# Altium PCB Power_Inverter_350VDC.PcbDoc (part 1 of 3)
Units mm, origin at the board's own origin, x right, y up, seen from the top; angles counter-clockwise.
Board outline 340.25 x 180.25 mm, 2 copper layers (Top Layer, Bottom Layer); 181 components, 76 nets, 433 pads, 298 vias.
Unrouted connection lines stored in the file: 1.
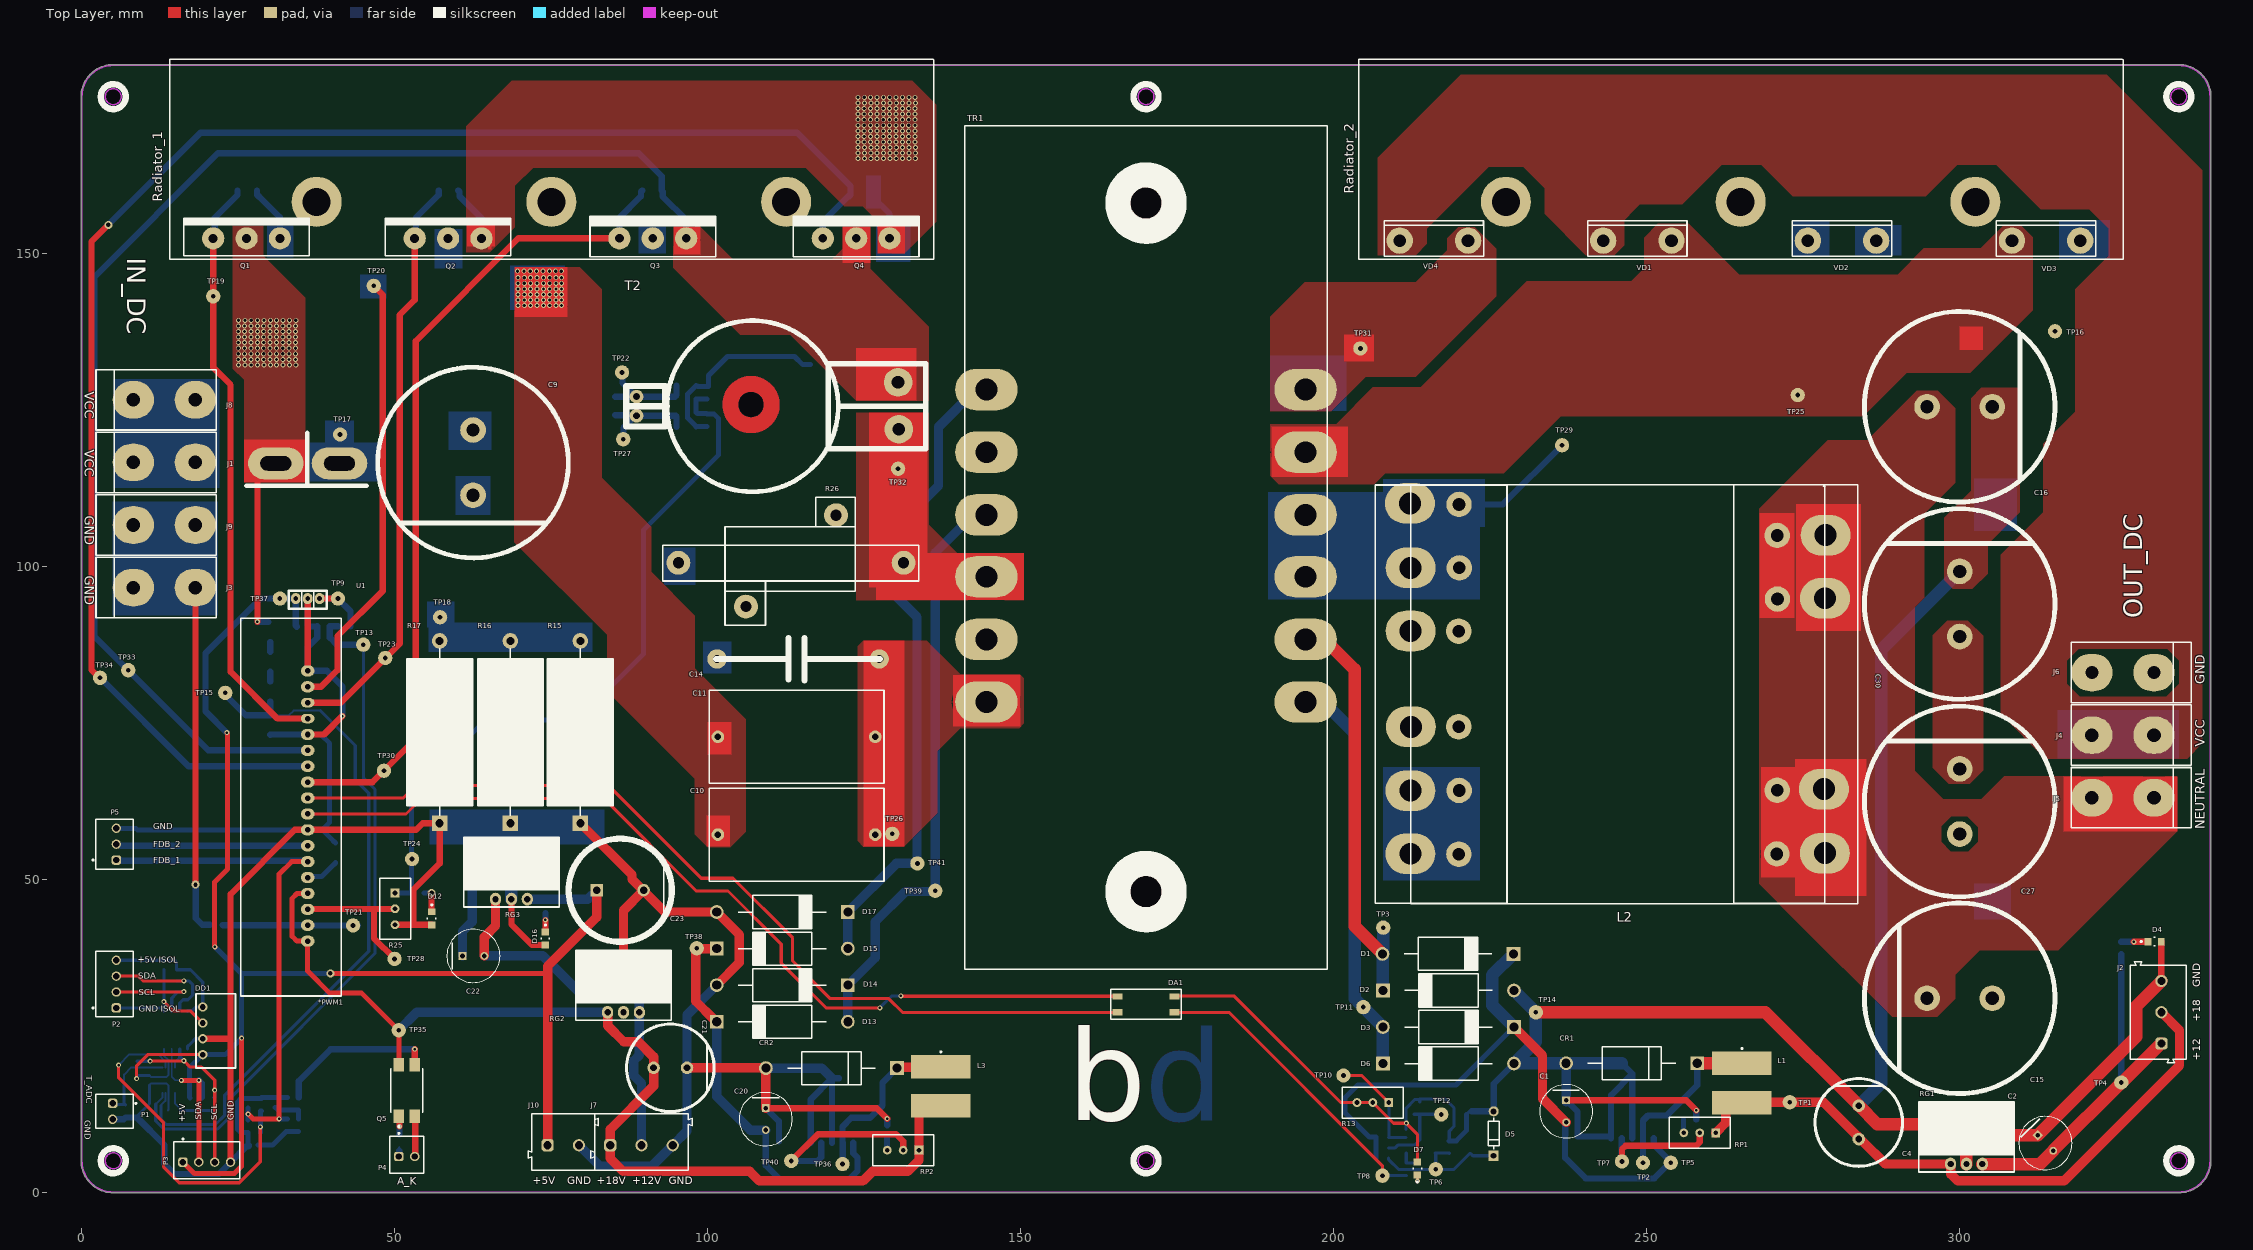
[diagram p0: Top Layer view]
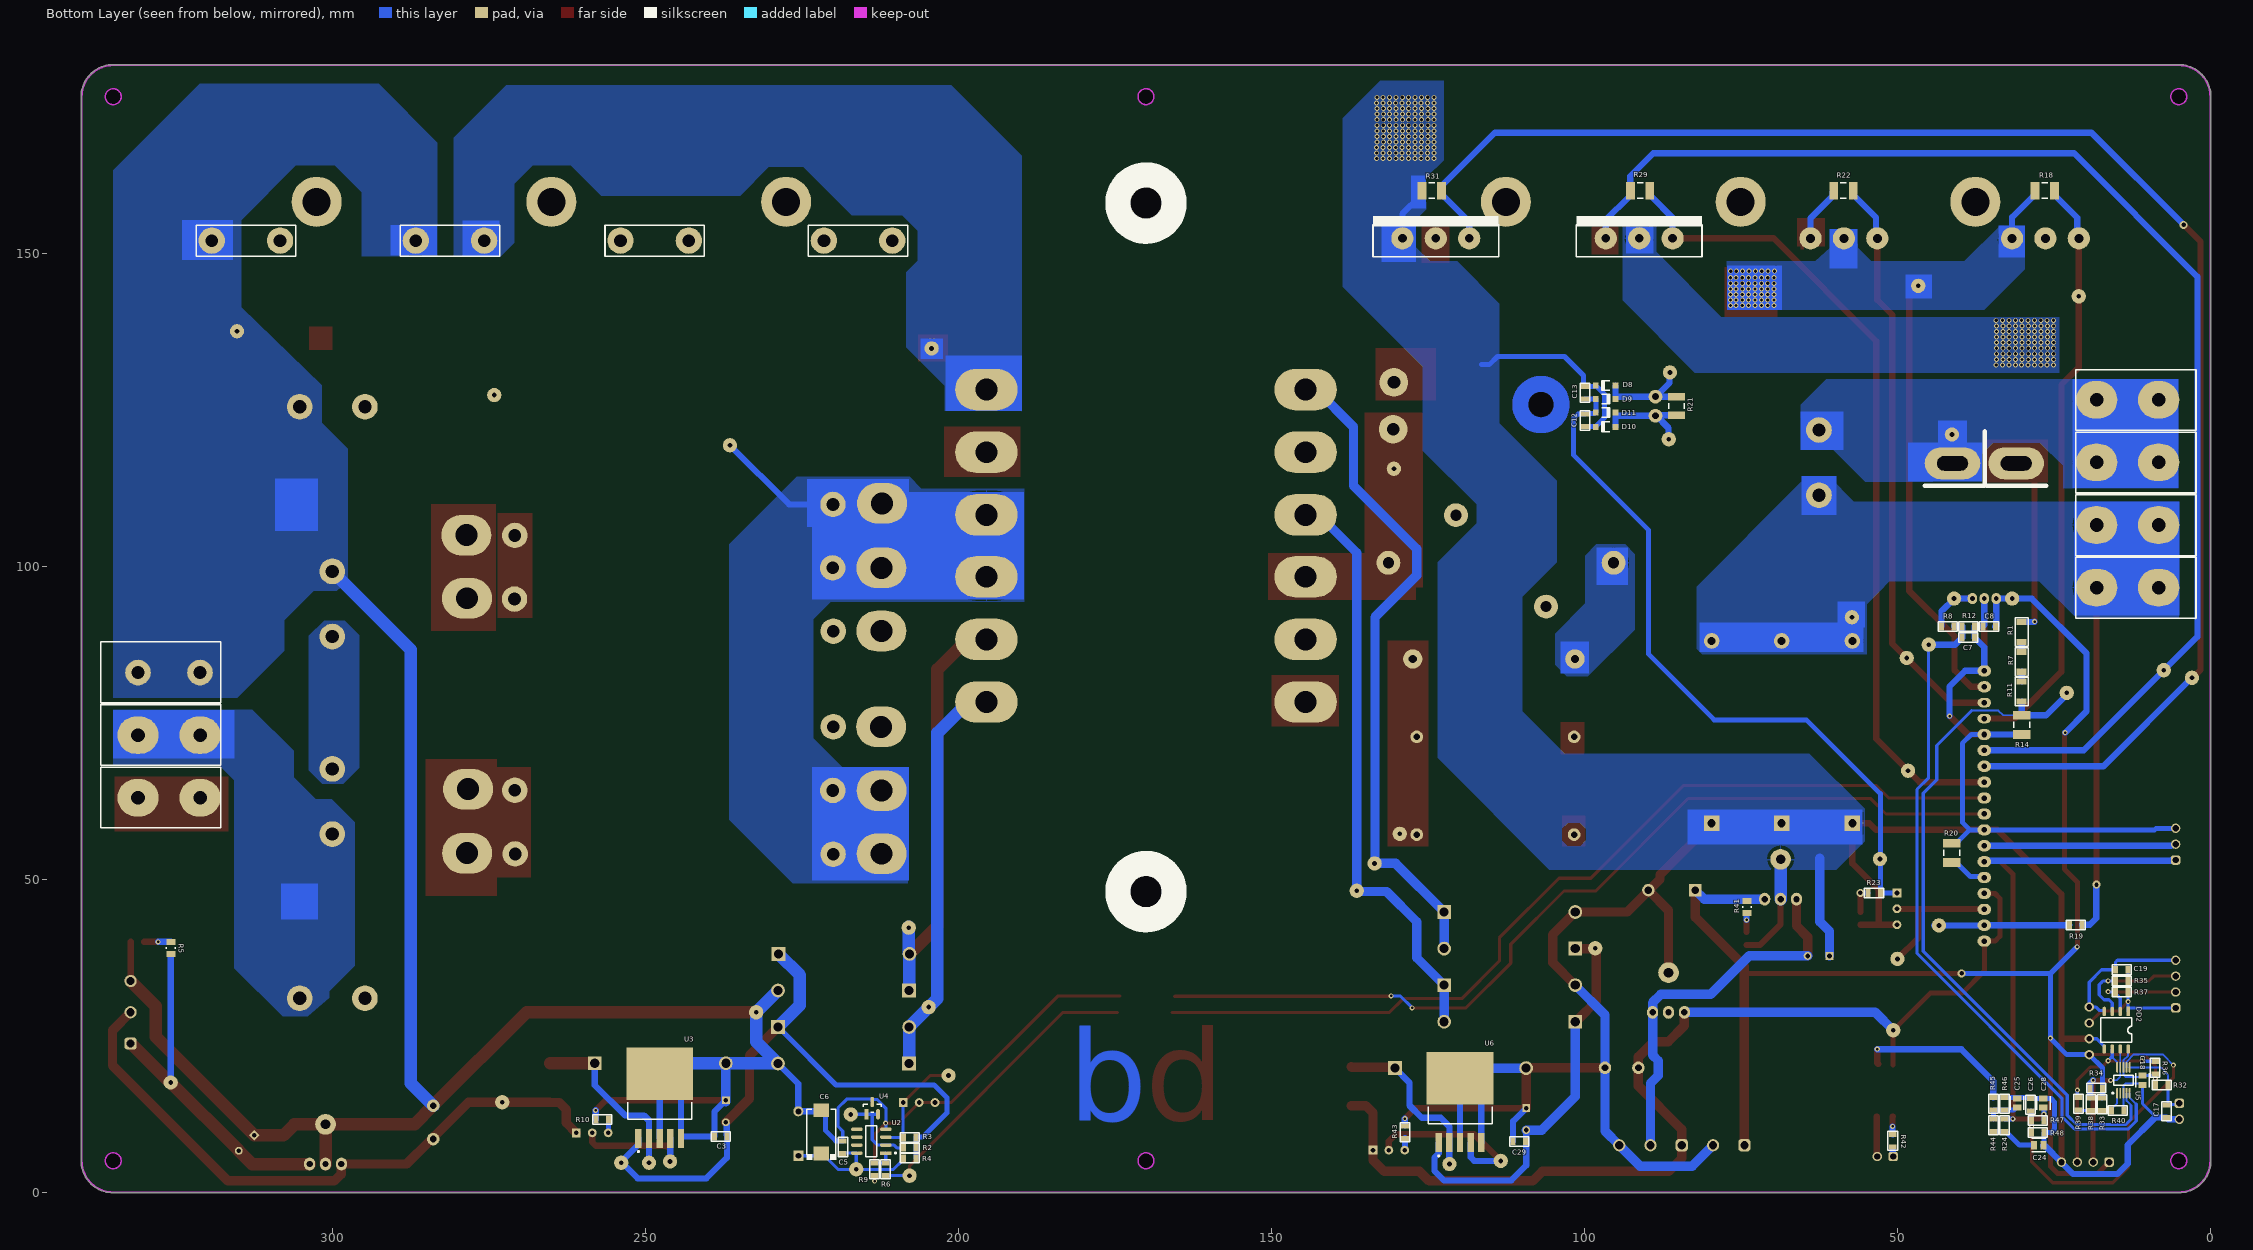
[diagram p1: Bottom Layer view, seen from below]
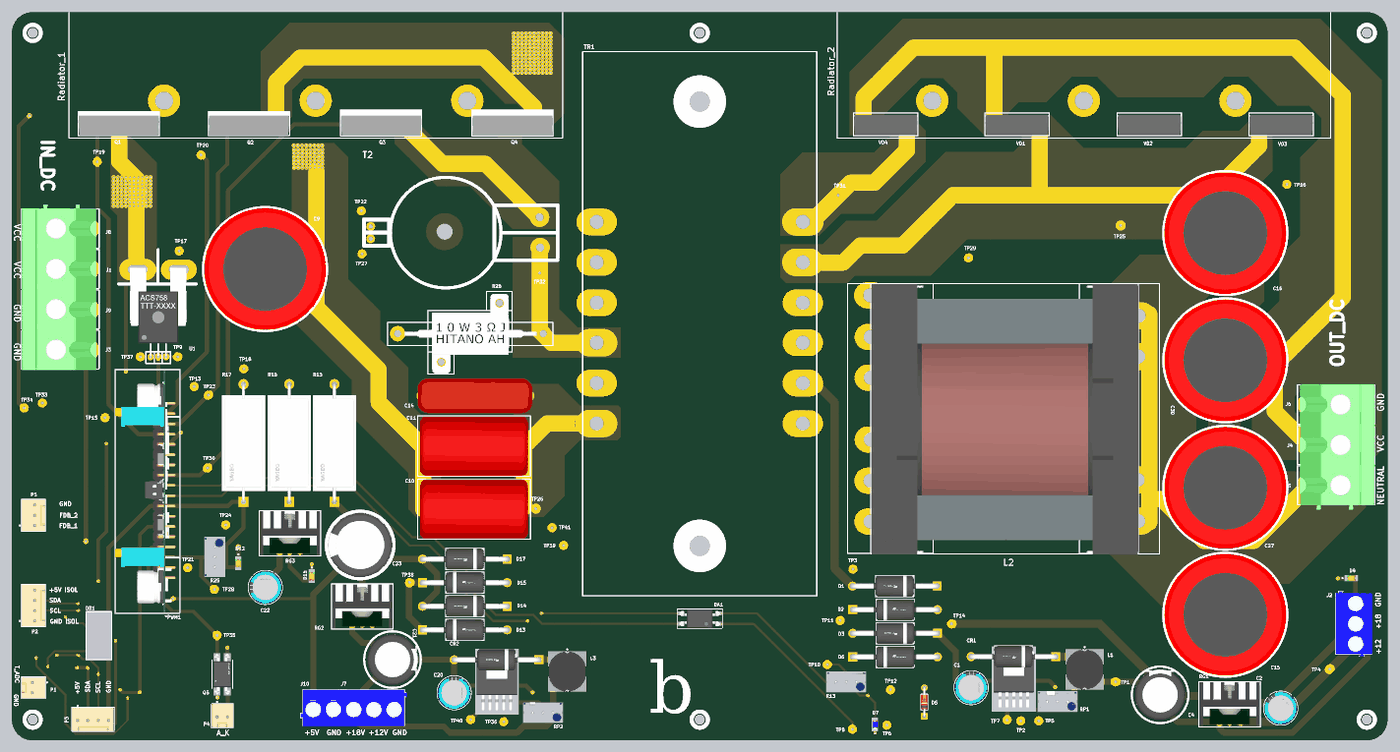
[diagram p3: 3D render of the assembled board from above, using the file's embedded part models]
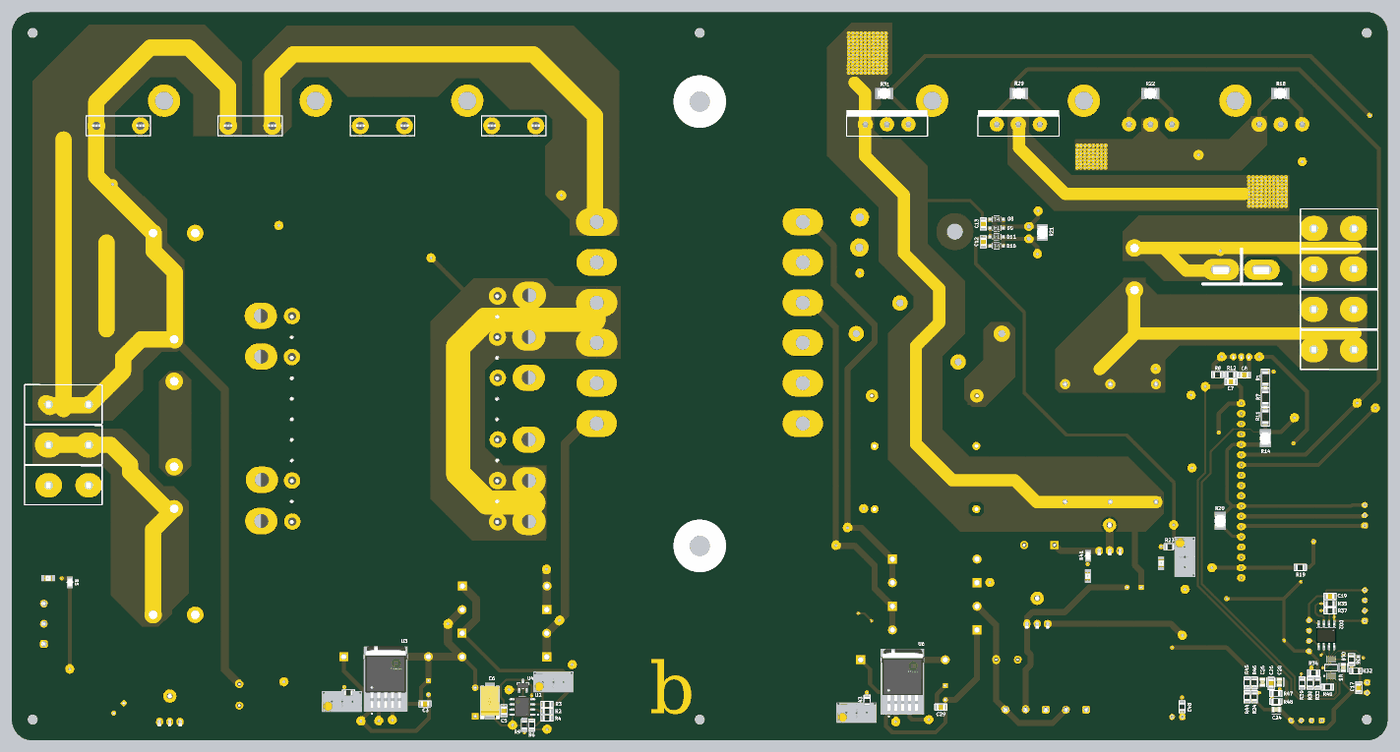
[diagram p4: 3D render of the assembled board from below, using the file's embedded part models]

## Layer stack, top to bottom
Top Solder: solder mask 0.0102, Solder Resist, Dk 3.5
Top Layer: signal copper 0.0356
Dielectric 1: dielectric 0.32, FR-4, Dk 4.8
Bottom Layer: signal copper 0.0356
Bottom Solder: solder mask 0.0102, Solder Resist, Dk 3.5

## Board outline
-0.125,5.022 cw(c0.002,5.022) -0.124,5.039 cw(c0.002,5.055) -0.125,5.055 -0.125,175.022 cw(c0.002,175.022) -0.125,175.026 cw(c5.002,175.022) 5.002,180.149 335.028,180.149 cw(c335.028,180.022) 335.033,180.149 cw(c335.002,175.022) 340.129,175.022 340.129,5.055 cw(c340.002,5.055) 340.128,5.038 cw(c340.002,5.022) 340.129,5.022 cw(c335.002,5.022) 335.033,-0.105 cw(c335.028,0.022) 335.028,-0.105 5.002,-0.105 cw(c5.002,5.022)
cut-out: 3.732,175.022 ccw(c5.002,175.022) 5.002,173.752 ccw(c5.002,175.022) 6.272,175.022 ccw(c5.002,175.022) 5.002,176.292 ccw(c5.002,175.022)
cut-out: 168.732,175.022 ccw(c170.002,175.022) 170.002,173.752 ccw(c170.002,175.022) 171.272,175.022 ccw(c170.002,175.022) 170.002,176.292 ccw(c170.002,175.022)
cut-out: 333.732,175.022 ccw(c335.002,175.022) 335.002,173.752 ccw(c335.002,175.022) 336.272,175.022 ccw(c335.002,175.022) 335.002,176.292 ccw(c335.002,175.022)
cut-out: 333.732,5.022 ccw(c335.002,5.022) 335.002,3.752 ccw(c335.002,5.022) 336.272,5.022 ccw(c335.002,5.022) 335.002,6.292 ccw(c335.002,5.022)
cut-out: 168.732,5.022 ccw(c170.002,5.022) 170.002,3.752 ccw(c170.002,5.022) 171.272,5.022 ccw(c170.002,5.022) 170.002,6.292 ccw(c170.002,5.022)
cut-out: 3.732,5.022 ccw(c5.002,5.022) 5.002,3.752 ccw(c5.002,5.022) 6.272,5.022 ccw(c5.002,5.022) 5.002,6.292 ccw(c5.002,5.022)

## Design rules (kind name [scope] priority, off if disabled: settings)
Clearance [All] p1: gap=0.254 ignorepadtopadclearanceinfootprint=TRUE except(0: THPad-Hole Via-Hole Fill-Hole Poly-Hole Region-Hole Text-Hole; 0.15: SMDPad-SMDPad SMDPad-THPad SMDPad-Via SMDPad-Fill SMDPad-Poly SMDPad-Region SMDPad-Text SMDPad-Hole; 0.2: Arc-Arc Arc-Track Arc-SMDPad Arc-THPad Arc-Via Arc-Fill Arc-Poly Arc-Region Arc-Text Arc-Hole Track-Track Track-SMDPad Track-THPad Track-Via Track-Fill Track-Poly Track-Region Track-Text Track-Hole Poly-Poly)
ComponentClearance [All] p1: gap=-5 collisioncheckmode=3 verticalgap=0.254 showdistances=FALSE
DiffPairsRouting [All] p1: maxlimit=5 minlimit=0.254 mostfreqgap=0.254 toplayer_minwidth=0.381 toplayer_maxwidth=0.381 toplayer_prefwidth=0.381 bottomlayer_minwidth=0.381 bottomlayer_maxwidth=0.381 bottomlayer_prefwidth=0.381 maxuncoupledlength=12.7
Height [All] p1: minheight=0 maxheight=150 prefheight=50
MinimumSolderMaskSliver [All] p1: minsoldermaskwidth=0.15
PlaneClearance [All] p1: clearance=0.7
PlaneConnect [All] p1: planeconnectstyle=Relief reliefexpansion=0.508 reliefentries=4 reliefconductorwidth=0.254 reliefairgap=0.5
PolygonConnect [All] p1: connectstyle=Relief reliefconductorwidth=0.254 reliefentries=4 polygonreliefangle="90 Angle" airgapwidth=0.5
RoutingVias [All] p1: holewidth=0.711 width=1.27 viastyle="Through Hole" minholewidth=0.711 minwidth=1.27 maxholewidth=0.711 maxwidth=1.27
SilkToSilkClearance [All] p1: silktosilkclearance=0.15
SilkToSolderMaskClearance [IsPad] p1: minsilkscreentomaskgap=0.15 clearancetoexposedcopper=TRUE
SolderMaskExpansion [All] p1: expansion=0.102 istentingtop=FALSE
Width [All] p1: maxlimit=5 minlimit=0.254 preferedwidth=2 minimp=50.000000 maximp=50.000000 favimp=50.000000
22 further rules are at their usual default settings.

## Components (designator, comment, footprint, x,y, rotation, side; value= is the part's Value field where it differs from the comment)
*PWM1 "PWM_controller" PWM_controller 85.092,68.682 r270 top locked
C1 "UKA1H101MPD1TD" FP-UKA1H101MPD1TD-MFG 237.125,12.925 r270 top locked
C2 "UKA1H101MPD1TD" FP-UKA1H101MPD1TD-MFG 313.7,7.85 r315 top
C3 "0.1uF" CAP-0805 237.95,8.9 r180 bottom locked
C4 "1000uF_50V" CAP_POL_13x26_1000uF_50V 283.875,11.15 r90 top
C5 "0.1uF" CAP-0805 218.442,7.214 r270 bottom
C6 "CAP-POLAR" CAP-TAN-D 221.871,9.627 r90 bottom
C7 "0.1uF" CAP-0805 38.61,88.621 r180 bottom
C8 "0.1uF" CAP-0805 35.316,90.352 r180 bottom
C9 "450V_330uF" CAP_450V_330uF 62.486,116.561 r180 top
C10 "3.3uF_630V" CAP_4.7uF_630V 114.175,57.125 r180 top
C11 "3.3uF_630V" CAP_4.7uF_630V 114.175,72.746 r180 top
C12 "1uF" CAP-0805 99.875,123.292 r270 bottom
C13 "1uF" CAP-0805 99.875,127.737 r90 bottom
C14 "1.5uF_630V" CAP_1.5uf_400V 114.429,85.192 r0 top
C15 "450V_330uF" CAP_450V_330uF 300,30.975 r90 top locked
C16 "450V_330uF" CAP_450V_330uF 300,125.475 r270 top locked
C17 "0.1uF" CAP-0805 6.987,12.929 r90 bottom
C18 "C0805C224K5RACTU" FP-C0805C-DN-MFG 10.797,17.882 r90 bottom value="0.22 μF"
C19 "CAP-NON-POLAR" CAP-0805 14.099,35.535 r0 bottom
C20 "UKA1H101MPD1TD" FP-UKA1H101MPD1TD-MFG 109.25,11.675 r270 top locked
C21 "1000uF_50V" CAP_POL_13x26_1000uF_50V 94.008,19.875 r0 top locked
C22 "UKA1H101MPD1TD" FP-UKA1H101MPD1TD-MFG 62.55,37.75 r0 top
C23 "CAP-POLAR" CAPPOL-16x25 86,48.25 r0 top
C24 "C0805C104K5RACTU" FP-C0805C-DN-MFG 27.386,7.52 r180 bottom value="0.10 μF"
C25 "C0805C104K5RACTU" FP-C0805C-DN-MFG 30.815,14.251 r90 bottom value="0.10 μF"
C26 "CAP-NON-POLAR" CAP-0805 28.656,13.997 r270 bottom
C27 "500V_470uF" CAP_450V_330uF 300,62.418 r0 top locked
C28 "C0805C104K5RACTU" FP-C0805C-DN-MFG 26.624,14.251 r90 bottom value="0.10 μF"
C29 "0.1uF" CAP-0805 110.35,8.125 r180 bottom
C30 "500V_470uF" CAP_450V_330uF 300,93.975 r0 top locked
CR1 "1N5822" FP-DO-201AD-MFG 247.605,20.6 r180 top locked
CR2 "1N5822" FP-DO-201AD-MFG 119.745,19.825 r180 top locked
D1 "" SR5100(DO-201AD 218.244,38.075 r180 top locked
D2 "" SR5100(DO-201AD 218.315,32.233 r0 top locked
D3 "" SR5100(DO-201AD 218.315,26.391 r180 top locked
D4 "LED" LED_GREEN 331.15,40.025 r0 top
D5 "BZX55B8V2" BZX55B8V2 225.554,9.373 r90 top
D6 "" SR5100(DO-201AD 218.315,20.549 r0 top locked
D7 "151031YS06000" LED_BLUE 213.362,3.785 r90 top
D8 "1N4148W-7-F" DIOD-SOD123-2_V 96.573,128.88 r0 bottom
D9 "1N4148W-7-F" DIOD-SOD123-2_V 96.573,126.721 r180 bottom
D10 "1N4148W-7-F" DIOD-SOD123-2_V 96.573,122.276 r0 bottom
D11 "1N4148W-7-F" DIOD-SOD123-2_V 96.573,124.562 r180 bottom
D12 "151031YS06000" LED_GREEN 55.867,43.751 r270 top
D13 "" SR5100(DO-201AD 111.89,27.234 r0 top locked
D14 "" SR5100(DO-201AD 111.89,33.076 r180 top locked
D15 "" SR5100(DO-201AD 111.89,38.918 r0 top locked
D16 "LED" LED_GREEN 74.025,40.525 r270 top
D17 "" SR5100(DO-201AD 111.89,44.76 r180 top locked
DA1 "PC817" 4-SMD 170.002,30 r180 top locked
DD1 "B0505S-1W" PLS-4-2.54mm 19.306,25.786 r270 top locked
DD2 "ADUM1250ARZ" SO8-150 14.988,25.883 r270 bottom
J1 "MG_136_HT" Conn_MEIGAN_MG136HT#1 10.764,116.593 r270 top
J2 "691101710003" 691101710003 331.725,28.75 r90 top
J3 "MG_136_HT" Conn_MEIGAN_MG136HT#1 10.764,96.593 r270 top
J4 "MG_136_HT" Conn_MEIGAN_MG136HT#1 328.502,73.022 r90 top locked
J5 "MG_136_HT" Conn_MEIGAN_MG136HT#1 328.502,63.022 r90 top locked
J6 "MG_136_HT" Conn_MEIGAN_MG136HT#2 328.502,83.022 r90 top locked
J7 "691101710003" 691101710003 89.4,8 r0 top locked
J8 "MG_136_HT" Conn_MEIGAN_MG136HT#1 10.764,126.593 r270 top
J9 "MG_136_HT" Conn_MEIGAN_MG136HT#1 10.764,106.593 r270 top
J10 "691101710002" 691101710002 76.9,8 r0 top locked
L1 "22µH, 2.04A" WE-PD2_1054 265.2,17.45 r270 top locked
L2 "750311457" Drossel 248.002,81.022 r270 top locked
L3 "22µH, 2.04A" WE-PD2_1054 137.225,16.925 r270 top
P1 "61900211121" 61900211121 5.209,12.929 r90 top
P2 "61900411121" 61900411121 5.2,33.249 r270 top
P3 "61900411121" 61900411121 19.941,5.101 r180 top
P4 "61900211121" 61900211121 51.9,6 r180 top locked
P5 "61900311121" 61900311121 5.2,55.601 r270 top locked
Q1 "IGBT 60N120TG" TO-264-3#1 26.302,153.022 r0 top locked
Q2 "IGBT 60N120TG" TO-264-3#1 58.502,153.022 r0 top locked
Q3 "IGBT 60N120TG" TO-264-3#2 91.202,153.022 r0 top
Q4 "IGBT 60N120TG" TO-264-3#2 123.702,153.022 r0 top
Q5 "PC817XNNIP0F" FP-PC817XNNIP0F-MFG 51.9,16.25 r90 top
R1 "300K" RES-1206 30.101,89.51 r90 bottom
R2 "10K" RES-0805 207.774,7.087 r180 bottom
R3 "1K" RES-0805 207.774,8.738 r180 bottom
R4 "1K" RES-0805 207.774,5.436 r180 bottom
R5 "10K" FP-CRCW0805-e3-MFG 325.8,39 r270 bottom
R6 "1K" RES-0805 211.584,3.658 r90 bottom
R7 "300K" RES-1206 30.101,84.735 r90 bottom
R8 "1K" RES-0805 41.912,90.399 r0 bottom
R9 "1K" RES-0805 213.362,3.658 r270 bottom
R10 "1K" RES-0805 256.9,11.625 r180 bottom
R11 "300K" RES-1206 30.101,79.985 r90 bottom
R12 "100K" RES-0805 38.61,90.399 r0 bottom
R13 "10K" RES_Adj_3296W_Bourns 206.25,14.326 r90 top
R14 "1K" FP-CRCW1210-e3-IPC_A 30.101,74.651 r90 bottom
R15 "0.5_Ohm" RES_5W_Ceramic_Yageo 79.631,73.508 r90 top
R16 "0.5_Ohm" RES_5W_Ceramic_Yageo 68.455,73.508 r90 top
R17 "0.5_Ohm" RES_5W_Ceramic_Yageo 57.152,73.508 r90 top
R18 "3.3K" RES_SMD_1210_IPC_A 26.418,160.022 r180 bottom locked
R19 "470 Ohm" RES-0805 21.475,42.7 r0 bottom
R20 "10K" FP-CRCW1210-e3-IPC_A 41.277,54.204 r270 bottom
R21 "CRCW12100000Z0EA" FP-CRCW1210-e3-IPC_B 85.225,125.6 r90 bottom
R22 "RES_1210" RES_SMD_1210_IPC_A 58.576,160.022 r180 bottom locked
R23 "10K" RES-0805 53.692,47.815 r180 bottom
R24 "10K" RES-0805 32.847,10.695 r90 bottom
R25 "3296W-1-202LF" RES_Adj_3296W_Bourns 50.025,45.275 r180 top
R26 "RES_10W" "10W 3 Ohm" 113.286,100.559 r180 top
R29 "RES_1210" RES_SMD_1210_IPC_A 91.061,160.022 r180 bottom locked
R31 "RES_1210" RES_SMD_1210_IPC_A 124.362,160.022 r180 bottom locked
R32 "10K" RES-0805 7.749,17.12 r0 bottom
R33 "10K" RES-0805 17.274,14.072 r90 bottom
R34 "10K" RES-0805 18.163,16.612 r180 bottom
R35 "10K" RES-0805 14.099,33.757 r180 bottom
R36 "10K" RES-0805 8.775,19.875 r270 bottom
R37 "10K" RES-0805 14.099,31.979 r180 bottom
R38 "10K" RES-0805 19.052,14.072 r270 bottom
R39 "10K" RES-0805 21.043,14.1 r270 bottom
R40 "10K" RES-0805 14.734,13.056 r0 bottom
R41 "10K" FP-CRCW0805-e3-MFG 73.975,45.575 r90 bottom
R42 "10K" RES-0805 50.7,8.2 r90 bottom
R43 "1K" RES-0805 128.625,9.6 r270 bottom
R44 "10K" RES-0805 34.625,10.695 r270 bottom
R45 "10K" RES-0805 34.625,14.124 r270 bottom
R46 "10K" RES-0805 32.847,14.124 r90 bottom
R47 "10K" RES-0805 27.513,11.457 r180 bottom
R48 "10K" RES-0805 27.513,9.552 r0 bottom
Radiator_1 "Radiator_122X80_M4" Radiator_122X80_M4 75.002,165.022 r0 top locked
Radiator_2 "Radiator_122X80_M4" Radiator_122X80_M4 265.002,165.022 r0 top locked
RG1 "LM7812CT" TO-220_Bended_Rad 301.593,7.548 r0 top locked
RG2 "LM7812CT" TO-220_Bended_Rad 87.033,31.773 r0 top
RG3 "LM7805CT" TO-220_Bended_Rad 69.125,49.875 r0 top locked
RP1 "10K" RES_Adj_3296W_Bourns 258.475,9.475 r90 top locked
RP2 "10K" RES_Adj_3296W_Bourns 131.2,6.725 r90 top
T2 "Current_SENS" Current_Sens_Case 106.9,125.825 r270 top
TP1 "Test_Point_PCB" Test_Point 272.85,14.375 r0 top
TP2 "Test_Point_PCB" Test_Point 249.403,4.703 r0 top
TP3 "Test_Point_PCB" Test_Point 207.901,42.266 r0 top
TP4 "Test_Point_PCB" Test_Point 325.825,17.525 r0 top
TP5 "Test_Point_PCB" Test_Point 253.85,4.7 r0 top
TP6 "Test_Point_PCB" Test_Point 216.283,3.658 r180 top
TP7 "Test_Point_PCB" Test_Point 246.038,4.912 r0 top
TP8 "Test_Point_PCB" Test_Point 207.774,2.642 r180 top
TP9 "Test_Point_PCB" Test_Point 40.896,94.844 r0 top
TP10 "Test_Point_PCB" Test_Point 201.551,18.644 r90 top
TP11 "Test_Point_PCB" Test_Point 204.726,29.566 r90 top
TP12 "Test_Point_PCB" Test_Point 217.172,12.421 r270 top
TP13 "Test_Point_PCB" Test_Point 44.96,87.478 r90 top
TP14 "Test_Point_PCB" Test_Point 232.285,28.733 r90 top
TP15 "Test_Point_PCB" Test_Point 22.9,79.775 r90 top
TP16 "Test_Point_PCB" Test_Point 315.225,137.55 r90 top
TP17 "" Test_Point 41.25,121.05 r90 top
TP18 "Test_Point_PCB" Test_Point 57.225,91.85 r90 top
TP19 "Test_Point_PCB" Test_Point 20.975,143.125 r90 top
TP20 "Test_Point_PCB" Test_Point 46.625,144.8 r90 top
TP21 "Test_Point_PCB" Test_Point 43.326,42.624 r90 top
TP22 "Test_Point_PCB" Test_Point 86.3,130.975 r90 top
TP23 "Test_Point_PCB" Test_Point 48.475,85.35 r90 top
TP24 "Test_Point_PCB" Test_Point 52.75,53.225 r90 top
TP25 "Test_Point_PCB" Test_Point 274.125,127.35 r90 top
TP26 "Test_Point_PCB" Test_Point 129.45,57.25 r90 top
TP27 "Test_Point_PCB" Test_Point 86.475,120.3 r90 top
TP28 "Test_Point_PCB" Test_Point 49.95,37.275 r0 top
TP29 "Test_Point_PCB" Test_Point 236.475,119.325 r90 top
TP30 "Test_Point_PCB" Test_Point 48.25,67.325 r90 top
TP31 "Test_Point_PCB" Test_Point 204.25,134.8 r90 top
TP32 "Test_Point_PCB" Test_Point 130.4,115.575 r90 top
TP33 "Test_Point_PCB" Test_Point 7.4,83.4 r90 top
TP34 "Test_Point_PCB" Test_Point 2.9,82.175 r90 top
TP35 "Test_Point_PCB" Test_Point 50.625,25.875 r90 top
TP36 "Test_Point_PCB" Test_Point 121.525,4.5 r90 top
TP37 "Test_Point_PCB" Test_Point 31.625,94.844 r90 top
TP38 "Test_Point_PCB" Test_Point 98.225,38.975 r90 top
TP39 "Test_Point_PCB" Test_Point 136.325,48.15 r90 top
TP40 "Test_Point_PCB" Test_Point 113.325,5 r90 top
TP41 "Test_Point_PCB" Test_Point 133.475,52.525 r90 top
TR1 "EE85" EE85_Ferrite_Core 170.002,103.022 r90 top locked
U1 "ACS758" ACS758-100 36.07,104.623 r0 top locked
U2 "LM358DR2G" FP-751-07-IPC_C 213.877,8.15 r0 bottom
U3 "" ON_Semiconductor_936A-02_MFG 247.704,15.094 r180 bottom locked
U4 "" TL431_SOT-23-3(A) 213.743,13.437 r90 bottom
U5 "ADS1115IDGST" TI-DGS10_N 13.845,17.882 r90 bottom
U6 "" ON_Semiconductor_936A-02_MFG 119.827,14.393 r180 bottom
VD1 "MUR4060" TO-247-2 248.502,152.022 r0 top locked
VD2 "MUR4060" TO-247-2 281.202,152.022 r0 top locked
VD3 "MUR4060" TO-247-2 313.802,152.022 r0 top locked
VD4 "MUR4060" TO-247-2 216.002,152.022 r0 top locked

## Footprints (in the part's own frame and the unit in brackets; to place one, negate y for a bottom-side part, rotate by r counter-clockwise, add the part's x,y. Pads: shape width x height; smd on the part's side, far side on the other; paste and mask are expansions set on the pad)
4-SMD [mm]
  rect 1.6x1 smd: 1(-4.575,1.27) 2(-4.575,-1.27) 3(4.575,-1.27) 4(4.575,1.27)
  silkscreen extent -5.6,-2.4 5.6,2.4, body extent -5,-2.29 5,2.29, height 3.85
"10W 3 Ohm" [mm]
  round 3.81 hole 1.778: 1(-18,0) 2(18,0) GND(-7.2,-7.6) GND(7.2,7)
  silkscreen extent -20.4,-10.45 20.5,10, body extent -16.39,-9.85 16.4,9.85, height 10.59
61900211121 [mm] "2.54mm Male Locking Header, 2p"
  rrect50% 1.5x1.5 hole 1: 1(1.27,0.3)
  round 1.5 hole 1: 2(-1.27,0.3)
  silkscreen extent -2.71,-3.52 2.71,2.98, body extent -2.54,-2.9 2.54,2.9, height 11.53
61900311121 [mm] "2.54mm Male Locking Header, 3p"
  rrect50% 1.5x1.5 hole 1: 1(2.54,0.3)
  round 1.5 hole 1: 2(0,0.3) 3(-2.54,0.3)
  silkscreen extent -3.98,-3.52 3.98,2.98, body extent -3.81,-2.9 3.81,2.9, height 11.53
61900411121 [mm] "2.54mm Male Locking Header, 4p"
  rrect50% 1.5x1.5 hole 1: 1(3.81,0.3)
  round 1.5 hole 1: 2(1.27,0.3) 3(-1.27,0.3) 4(-3.81,0.3)
  silkscreen extent -5.25,-3.52 5.25,2.98, body extent -5.08,-2.9 5.08,2.9, height 11.53
691101710002 [mm] "5,00mm - modular - blue - Horizontal entry with pressure clamp - 12,6mm height - 02p"
  rrect50% 1.95x1.95 hole 1.3: 1(-2.5,-0.5)
  round 1.95 hole 1.3: 2(2.5,-0.5)
  silkscreen extent -5.6,-4.5 5.6,4.5, body extent -5.6,-4.5 5.6,4.5, height 12.65
691101710003 [mm] "5,00mm - modular - blue - Horizontal entry with pressure clamp - 12,6mm height - 03p"
  rrect50% 1.95x1.95 hole 1.3: 1(-5,-0.5)
  round 1.95 hole 1.3: 2(0,-0.5) 3(5,-0.5)
  silkscreen extent -8.1,-4.5 8.1,4.5, body extent -8.1,-4.5 8.1,4.5, height 12.65
ACS758-100 [mil]
  oval 60x70 hole 30: 1(-75,-385) 2(0,-385) 3(75,-385)
  oval 350x200 hole 90 slot 195 at 0 deg: 4(200,465) 5(-200,465)
  silkscreen extent -385,-449 370,665, body extent -276,-404 276,492, height 280
BZX55B8V2 [mm]
  rect 1.6x1.6 hole 0.95 paste-1000 mask+0: 1(-3.55,0)
  round 1.6 hole 0.95 paste-1000 mask+0: 2(3.55,0)
  silkscreen extent -2.52,-0.85 2.52,0.85, body extent -3.8,-0.85 3.8,0.85, height 4.7
CAP-0805 [mm]
  rect 0.8x1.25 smd mask+0.015: 1(-1,0) 2(1,0)
  silkscreen extent -1.52,-0.76 1.52,0.76, body extent -1,-0.62 1,0.63, height 0.8
CAP-TAN-D [mm]
  rect 2.2x2.5 smd: 1(-3.45,0) 2(3.45,0)
  silkscreen extent -4.5,-2.4 3.65,2.4, body extent -3.8,-2.3 3.8,2.3, height 4
CAP_1.5uf_400V [mm]
  round 3.1 hole 1.3: 1(-12.954,0) 2(12.954,0)
  silkscreen extent -13.08,-3.43 13.08,3.3, body extent -14.25,-4.3 14.25,4.3, height 17.66
CAP_4.7uF_630V [mil]
  round 80 hole 40: 1(-495,0) 2(495,0)
  silkscreen extent -550,-293 550,293, body extent -527,-289 527,289, height 1242
CAP_450V_330uF [mm]
  round 4.1 hole 2.1: 1(0,-5.207) 2(0,5.207)
  silkscreen extent -15.23,-15.22 15.22,15.22, body extent -15.1,-15.2 15.15,15.1, height 52.45
CAP_POL_13x26_1000uF_50V [mm]
  round 2 hole 1.1: 1(-2.667,0) 2(2.667,0)
  silkscreen extent -7,-7 7,7, body extent -6.3,-6.3 6.31,6.31, height 25.72
CAPPOL-16x25 [mm]
  rect 2x2 hole 1.2 paste-1000 mask+0: 1(-3.75,0)
  round 2 hole 1.2 paste-1000 mask+0: 2(3.75,0)
  silkscreen extent -8.25,-8.25 8.25,8.25, body extent -8.35,-8.35 8.35,8.35, height 0.25
Conn_MEIGAN_MG136HT#1 [mm]
  oval 6x6.6 hole 2.159: 1(0,7.366) 1(0,-2.54)
  silkscreen extent -4.83,-8.51 4.83,10.67, body extent -6,-8.55 5,9.95, height 30.95
Conn_MEIGAN_MG136HT#2 [mm]
  oval 6x6.6 / inner round 4.1 / far side round 4.1 hole 2.1: 1(0,7.366) 1(0,-2.54)
  silkscreen extent -4.83,-8.51 4.83,10.67, body extent -6,-8.55 5,9.95, height 30.95
Current_Sens_Case [mil]
  round 180 hole 80: 1(-140,925) 2(155,930)
  round 86.61 hole 43.31: 3(-50,-720) 4(70,-720)
  round 60 hole 157.48: 106(0,0)
  Top Layer circle w100: c0,0 r129.92
  Bottom Layer circle w100: c0,0 r129.92
  silkscreen extent -528,-785 548,1100, body extent -689,-742 689,963, height 750
DIOD-SOD123-2_V [mm] "SOD123, 2-Leads, Body 2.7x1.55mm, Height 1.45mm"
  rect 0.9x0.95 smd: 1(1.575,0) 2(-1.575,0)
  silkscreen extent -0.64,-0.83 0.64,0.77, body extent -1.88,-0.8 1.88,0.8, height 1.3
Drossel [mil]
  oval 255.91x314.96 hole 137.8: 1(-943,1204) 2(-546,1200) 3(655,1193) 4(1057,1199) 5(-1143,-1411) 6(-737,-1406) 7(664,-1408) 8(1061,-1408) 9(-340,-1406) 10(263,-1405)
  round 160 hole 80: 1(-941,899) 2(-541,901) 3(662,899) 4(1062,897) 5(-1136,-1102) 6(-737,-1100) 7(663,-1101) 8(1064,-1103) 9(-339,-1104) 10(262,-1104)
  silkscreen extent -1259,-1630 1376,1405, body extent -1251,-1399 1383,1203, height 2024
EE85_Ferrite_Core [mm]
  round 5.08 hole 5: 0(-55,0) 0(55,0)
  oval 6.6x10 hole 3.5: 1(-24.7,25.5) 2(-14.7,25.5) 3(-4.7,25.5) 4(5.2,25.5) 5(15.2,25.5) 6(25.2,25.5) 7(-24.7,-25.5) 8(-14.7,-25.5) 9(-4.7,-25.5) 10(5.2,-25.5) 11(15.2,-25.5) 12(25.2,-25.5)
  silkscreen extent -67.37,-28.96 67.37,28.96, body extent -67.5,-29 67.5,29, height 93.65
FP-751-07-IPC_C [mm]
  rect 1.874x0.543 smd paste+0 mask+0: 1(-2.316,1.905)
  rrect100% 1.874x0.543 smd paste+0 mask+0: 2(-2.316,0.635) 3(-2.316,-0.635) 4(-2.316,-1.905) 5(2.316,-1.905) 6(2.316,-0.635) 7(2.316,0.635) 8(2.316,1.905)
  silkscreen extent -3.98,-2.45 0.88,2.45, body extent -3,-2.45 3,2.45, height 1.75
FP-C0805C-DN-MFG [mm]
  rect 0.95x1.35 smd paste+0 mask+0: 1(-0.75,0) 2(0.75,0)
  silkscreen extent -1.1,-1.07 1.1,1.07, body extent -1,-0.63 1,0.63, height 0.88
FP-CRCW0805-e3-MFG [mm]
  rect 0.95x1.45 smd paste+0 mask+0: 1(-0.975,0) 2(0.975,0)
  silkscreen extent -0.13,-0.7 0.13,0.7, body extent -1,-0.63 1,0.63, height 0.5
FP-CRCW1210-e3-IPC_A [mm]
  rect 1.405x2.806 smd paste+0 mask+0: 1(-1.551,0) 2(1.551,0)
  silkscreen extent -0.47,-1.25 0.47,1.25, body extent -1.6,-1.25 1.6,1.25, height 0.6
FP-CRCW1210-e3-IPC_B [mm]
  rect 1.205x2.706 smd paste+0 mask+0: 1(-1.451,0) 2(1.451,0)
  silkscreen extent -0.47,-1.25 0.47,1.25, body extent -1.6,-1.25 1.6,1.25, height 0.6
FP-DO-201AD-MFG [mm]
  rect 2.2x2.2 hole 1.45 paste-1000 mask+0: 1(-10.47,0)
  round 2.2 hole 1.45 paste-1000 mask+0: 2(10.47,0)
  silkscreen extent -7,-2.65 7,2.65, body extent -11.67,-2.75 11.67,2.75, height 0.25
FP-PC817XNNIP0F-MFG [mm]
  rect 2.2x1.7 smd paste+0 mask+0: 1(-4.1,1.27) 2(-4.1,-1.27) 3(4.1,-1.27) 4(4.1,1.27)
  silkscreen extent -5.87,-2.54 3.5,2.54, body extent -5.3,-2.64 5.3,2.64, height 0.25
FP-UKA1H101MPD1TD-MFG [mm]
  rect 1.25x1.25 hole 0.75 paste-1000 mask+0: 1(-1.75,0)
  round 1.25 hole 0.75 paste-1000 mask+0: 2(1.75,0)
  silkscreen extent -4.25,-4.25 4.25,4.25, body extent -4.35,-4.35 4.35,4.35, height 0.25
LED_BLUE [mm]
  rect 1.1x1.2 smd paste+0 mask+0: 1(-1.05,0) 2(1.05,0)
  silkscreen extent -2.27,-0.67 0.13,0.67, body extent -1,-0.63 1,0.63, height 0.8
LED_GREEN [mm]
  rect 1.1x1.2 smd paste+0 mask+0: 1(-1.05,0) 2(1.05,0)
  silkscreen extent -2.27,-0.67 0.13,0.67, body extent -1,-0.63 1,0.63, height 0.8
ON_Semiconductor_936A-02_MFG [mm]
  rect 1.016x3.05 smd paste+0 mask+0: 1(-3.404,-6.485) 2(-1.702,-6.485) 3(0,-6.485) 4(1.702,-6.485) 5(3.404,-6.485)
  rect 10.66x8.38 smd paste+0 mask+0: 6(0,3.82)
  silkscreen extent -5.12,-8.72 5.12,-0.75, body extent -5.01,-7.11 5.01,7.14, height 4.83
PLS-4-2.54mm [mm]
  round 1.5 hole 0.9: 1(-3.81,0) 2(-1.24,0) 3(1.27,0) 4(3.81,0)
  silkscreen extent -5.95,-1.07 5.95,5.23, body extent -5.8,-0.92 5.8,5.08, height 10.16
PWM_controller [mil]
  oval 70x85 hole 35: 1(1125,-1930) 2(1025,-1930) 3(925,-1930) 4(825,-1930) 5(725,-1930) 6(625,-1930) 7(525,-1930) 8(425,-1930) 9(325,-1930) 10(225,-1930) 11(125,-1930) 12(25,-1930) 13(-75,-1930) 14(-175,-1930) 17(-475,-1930) 18(-575,-1930)
  oval 59.06x85 hole 35: 15(-275,-1930) 16(-375,-1930)
  silkscreen extent -905,-2350 1470,-1720, body extent -896,-2352 1466,-1720, height 2330
Radiator_122X80_M4 [mm]
  round 8 hole 4.5: 1(-37.5,-6.8) 1(0,-6.8) 1(37.5,-6.8)
  silkscreen extent -61,-16 61.1,16, body extent -61,-16 61,16, height 80.27
RES-0805 [mm]
  rect 0.8x1.25 smd mask+0.015: 1(-1,0) 2(1,0)
  silkscreen extent -1.52,-0.76 1.52,0.76, body extent -1,-0.62 1,0.63, height 0.6
RES-1206 [mm]
  rect 1x1.6 smd: 1(-1.6,0) 2(1.6,0)
  silkscreen extent -2.29,-1.02 2.29,1.02, body extent -1.6,-0.8 1.6,0.8, height 0.6
RES_5W_Ceramic_Yageo [mm]
  rect 2.5x2.5 hole 1.3 paste-1000 mask+0: 1(-14.555,0)
  round 2.5 hole 1.3 paste-1000 mask+0: 2(14.555,0)
  silkscreen extent -13.38,-5.25 13.38,5.25, body extent -15.43,-5.35 15.43,5.35, height 0.25
RES_Adj_3296W_Bourns [mm]
  rect 1.4x1.4 hole 0.75 paste-1000 mask+0: 1(0,-2.54)
  round 1.4 hole 0.75 paste-1000 mask+0: 2(0,0) 3(0,2.54)
  silkscreen extent -2.49,-4.89 2.47,4.89, body extent -2.59,-4.99 2.57,4.99, height 0.25
RES_SMD_1210_IPC_A [mm]
  rect 1.405x2.806 smd paste+0 mask+0: 1(-1.551,0) 2(1.551,0)
  silkscreen extent -0.47,-1.25 0.47,1.25, body extent -1.6,-1.25 1.6,1.25, height 0.6
SO8-150 [mm]
  rect 1.5x0.6 smd: 1(-3,1.9)
  oval 1.5x0.6 smd: 2(-3,0.63) 3(-3,-0.64) 4(-3,-1.91) 5(3,-1.91) 6(3,-0.64) 7(3,0.63) 8(3,1.9)
  silkscreen extent -1.95,-2.45 1.95,2.45, body extent -3,-2.45 3,2.45, height 1.7
SR5100(DO-201AD [mm]
  rect 2.2x2.2 hole 1.45 paste-1000 mask+0: 1(-10.47,0)
  round 2.2 hole 1.45 paste-1000 mask+0: 2(10.47,0)
  silkscreen extent -7,-2.67 7,2.67, body extent -11.67,-2.75 11.67,2.75, height 0.25
Test_Point [mil]
  round 90 hole 30 unplated paste+4 mask+4: 1(0,0)
TI-DGS10_N [mm] "SOP, 10-Leads, Body 3x3mm, Pitch 0.5mm, IPC Medium Density"
  oval 1.7x0.3 smd: 1(-2.05,1) 2(-2.05,0.5) 3(-2.05,0) 4(-2.05,-0.5) 5(-2.05,-1) 6(2.05,-1) 7(2.05,-0.5) 8(2.05,0) 9(2.05,0.5) 10(2.05,1)
  silkscreen extent -2.17,-1.55 0.8,1.83, body extent -1.55,-1.55 1.55,1.55, height 1.1
TL431_SOT-23-3(A) [mm]
  rect 1.659x0.627 smd paste+0 mask+0: 1(-0.977,0.915)
  rrect100% 1.659x0.627 smd paste+0 mask+0: 2(-0.977,-0.915) 3(0.977,0)
  silkscreen extent -0.65,-1.45 0.65,1.45, body extent -1.2,-1.45 1.2,1.45, height 1.1
TO-220_Bended_Rad [mil]
  oval 70x80 hole 40: 1(-120,-120) 2(-20,-120) 3(80,-120)
  round 130 hole 60: 2(-20,130)
  silkscreen extent -320,-170 280,270, body extent -315,-165 275,265, height 997
TO-247-2 [mm]
  round 4.2 hole 2.032: 1(-5.461,0) 3(5.461,0)
  silkscreen extent -7.94,-2.48 7.94,3.17, body extent -7.9,-2.3 7.9,2.71, height 37.4
TO-264-3#1 [mm]
  round 3.55 hole 1.45: 1(-5.334,-0.635) 2(0,-0.635) 3(5.334,-0.635)
  silkscreen extent -10.03,-3.43 10.03,2.54, body extent -10,-3.5 10,1.5, height 38.4
TO-264-3#2 [mm]
  round 3.556 hole 1.397: 1(-5.334,-0.635) 2(0,-0.635) 3(5.334,-0.635)
  silkscreen extent -10.03,-3.56 10.16,2.92, body extent -10,-3.5 10,1.5, height 32.05
WE-PD2_1054 [mm] "SMD Power Inductor, 2-Leads, body 10x9mm"
  rect 3.75x9.5 smd: 1(-3.125,0) 2(3.125,0)
  silkscreen extent -5.62,-0.12 -5.38,0.13, body extent -5.04,-4.5 5.04,4.5, height 5.43

## Part data
C1 C2 C20 C22: library part CMP-12462-000027-1, "CAP ALUM 100UF 20% 50V RADIAL", Capacitance=100uF, Case/Package=Radial, Leakage Current=4uA, Max Operating Temperature=105°C, Min Operating Temperature=-55°C, Package Quantity=1, Ripple Current=190mA, Tolerance=20%, Voltage Rating=50V, Diameter=8mm, Height=11.5mm, Height - Seated (Max)=0.512inch, Lead Pitch=3.5mm, Length=11.5mm, Life (Hours)=2000Hour, Mount="Through Hole", Packaging="Tape and Reel", REACH SVHC="No SVHC", Series=KA, Termination=Radial, Voltage Rating (DC)=50V
C3 C5 C7 C8 C10 C11 C12 C13 C17 C29: library part CAP-NON-POLAR
C4 C21: library part CAP_polar_Hitano
C9: library part CAP_POL_LOW_IMP
C14: library part 3.3uF_630V
C15 C16 C27 C30: library part CAP_450V_330uF
C18: library part CMP-1036-04552-2, "CAP CER 0.22UF 50V X7R 0805", Capacitance="0.22 μF", Manufacturer=KEMET, Package=C0805C-DN, Temperature="-55°C to +125°C", Temperature Characteristic=X7R, Temperature Coefficient=30ppm/°C, Temperature Range High=+125°C, Temperature Range Low=-55°C, Tolerance=0.1, Voltage Rating="50 V", Automotive=No, Category=Cap, ComponentLink2Description=Datasheet, ComponentLink2URL=https://content.kemet.com/datasheets/KEM_C1003_C0G_SMD.pdf, Device Class L1="Passive Components", Device Class L2=Capacitors, Device Class L3="Ceramic Capacitors", Digikey Description="CAP CER 0.22UF 50V X7R 0805", Height=0.88mm, Ipc Land Pattern Name=CAPC200125X78, Lead Free=Yes, Manufacturer Part Number=C0805C224K5RACTU, Material=Ceramic, Mouser Description="CAP CER 0.22UF 50V X7R 0805", Octopart=https://octopart.com/c0805c224k5ractu-kemet-144670, RoHS=TRUE
C24 C25 C28: library part CMP-2007-00279-2, "CAP CER 0.1UF 50V X7R 0805", Capacitance="0.10 μF", Manufacturer=KEMET, Package=C0805C-DN, Temperature="-55°C to +125°C", Temperature Characteristic=X7R, Temperature Coefficient=30ppm/°C, Temperature Range High=+125°C, Temperature Range Low=-55°C, Tolerance=0.1, Voltage Rating="50 V", Automotive=No, Category=Cap, ComponentLink2Description=Datasheet, ComponentLink2URL=https://content.kemet.com/datasheets/KEM_C1003_C0G_SMD.pdf, Device Class L1="Passive Components", Device Class L2=Capacitors, Device Class L3="Ceramic Capacitors", Digikey Description="CAP CER 0.1UF 50V X7R 0805", Height=0.88mm, Ipc Land Pattern Name=CAPC200125X78, Lead Free=Yes, Manufacturer Part Number=C0805C104K5RACTU, Material=Ceramic, Mouser Description="Cap Ceramic 0.1uF 50V X7R 10% SMD 2.0 x 1.2 mm 125 C Paper T/R", Octopart=https://octopart.com/c0805c104k5ractu-kemet-143926, RoHS=TRUE
CR1 CR2: "DIODE SCHOTTKY 40V 3A DO201AD", Forward Current=3A, Manufacturer=STMicroelectronics, Max Junction Temp=+150°C, Max Repetitive Reverse Voltage=40V, Max Surge Forward Current=80A, Package=DO-201AD, Peak Reverse Current=2mA, Temperature="to +150°C", Automotive=No, Category=Diode, ComponentLink2Description=Datasheet, ComponentLink2URL=https://www.st.com/resource/en/datasheet/1n5822.pdf, Device Class L1="Discrete Semiconductors", Device Class L2=Diodes, Device Class L3="Schottky Diodes", Digikey Description="DIODE SCHOTTKY 40V 3A DO201AD", Height=5.3mm, Lead Free=Yes, Manufacturer Part Number=1N5822, Mouser Description="Schottky Diodes & Rectifiers Vr/40V Io/3A BULK", Octopart=https://octopart.com/1n5822-stmicroelectronics-323225, RoHS=TRUE, Temperature Range High=+150°C
D1 D2 D3 D6 D13 D14 D15 D17: library part SR5100
D4 D16: "WURTH ELEKTRONIK - 151031YS06000 - LED, Yellow, Through Hole, T-1 (3mm), 30 mA, 2 V, 590 nm", Manufacturer_Name="Wurth Elektronik", Manufacturer_Part_Number=151031YS06000, Mouser Part Number=710-151031YS06000, Datasheet Link=https://katalog.we-online.de/led/datasheet/151031YS06000.pdf, Geometry.Height=5.5mm, Mouser Price/Stock=https://www.mouser.co.uk/ProductDetail/Wurth-Elektronik/151031YS06000?qs=LlUlMxKIyB3xSYYW%252BcuBiQ%3D%3D
D7 D12: library part LED, "WURTH ELEKTRONIK - 151031YS06000 - LED, Yellow, Through Hole, T-1 (3mm), 30 mA, 2 V, 590 nm", Manufacturer_Name="Wurth Elektronik", Mouser Part Number=710-151031YS06000, Datasheet Link=https://katalog.we-online.de/led/datasheet/151031YS06000.pdf, Geometry.Height=5.5mm, Manufacturer_Part_Number=151031YS06000, Mouser Price/Stock=https://www.mouser.co.uk/ProductDetail/Wurth-Elektronik/151031YS06000?qs=LlUlMxKIyB3xSYYW%252BcuBiQ%3D%3D
D8 D9 D10 D11: library part 1N4148, "Fast Switching Diode, 100 V, 0.15 A, -65 to 150 degC, 2-Pin?SOD123, RoHS, Tape and Reel", If - Forward Current=0.15A, Ir - Reverse Current=1uA, Manufacturer=DiodesIncorporated, Max Surge Current=2A, Maximum Operating Temperature=+150C, Minimum Operating Temperature=-65C, Operating Temperature Range=-65Cto+150C, Package / Case=SOD-123, Package Reference=SOD123-2, Peak Reverse Voltage=100V, Vf - Forward Voltage=1.25V, Brand=DiodesIncorporated, Configuration=Single, Datasheet URL=http://www.farnell.com/datasheets/1915529.pdf, Datasheet Version="Rev. 24-2, 10/2013", Factory Pack Quantity=3000, Height=1.25mm, Length=2.85mm, Manufacturer URL=http://www.diodes.com/, Mounting Style=SMD/SMT, Package URL=http://www.diodes.com/datasheets/ds18004.pdf, Packaging=Reel, Product=SwitchingDiodes, Product Category=Diodes-GeneralPurpose,Power,Switching, Recovery Time=4ns, RoHS=True, Series=1N4148, Type=SwitchingDiode, Unit Weight=0.000353oz, Width=1.7mm
J1 J3 J4 J5 J6 J8 J9: library part Connector_MEIGAN_MG136HT
J2 J7: "WR-TBL Series 101 Horizontal Entry Modular, THT, pitch 5mm, 3p", Manufacturer="Wurth Elektronik", Operating Temperature Max=105°C, Operating Temperature Min=-40°C, Rated Current=16A, Working Voltage=250V, Application="Pressure Clamp", Category="Terminal Blocks", ComponentLink1Description="Website Link", ComponentLink1URL=https://www.we-online.com/redexpert/article/691101710003?ad, ComponentLink2Description="Datasheet Link", ComponentLink2URL=https://www.we-online.com/redexpert/spec/691101710003?ad, Manufacturer Part Number=691101710003, Match Code=WR-TBL, Modularity=Yes, Mount="Through Hole", Number of Pins=3, Number of Rows=1, Orientation=Horizontal, Packaging=Box, Pitch=5mm
J10: "WR-TBL Series 101 Horizontal Entry Modular, THT, pitch 5mm, 2p", Manufacturer="Wurth Elektronik", Operating Temperature Max=105°C, Operating Temperature Min=-40°C, Rated Current=16A, Working Voltage=250V, Application="Pressure Clamp", Category="Terminal Blocks", ComponentLink1Description="Website Link", ComponentLink1URL=https://www.we-online.com/redexpert/article/691101710002?ad, ComponentLink2Description="Datasheet Link", ComponentLink2URL=https://www.we-online.com/redexpert/spec/691101710002?ad, Manufacturer Part Number=691101710002, Match Code=WR-TBL, Modularity=Yes, Mount="Through Hole", Number of Pins=2, Number of Rows=1, Orientation=Horizontal, Packaging=Box, Pitch=5mm
L1 L3: library part 744776122, "WE-PD2 SMT Power Inductor, size 1054, 22µH, 2.04A, 0.1Ω", Case/Size Code=1054, DC Resistance=0.051Ω, DC Resistance Max=0.1Ω, Inductance=22µH, Manufacturer="Wurth Elektronik", Operating Temperature Max=125°C, Operating Temperature Min=-40°C, Rated Current=2.04A, Saturation Current=2.07A, Self Resonant Frequency=16MHz, Category="Unshielded Power Inductors", ComponentLink1Description="Website Link", ComponentLink1URL=https://www.we-online.com/redexpert/article/744776122?ad, ComponentLink2Description="Datasheet Link", ComponentLink2URL=https://www.we-online.com/redexpert/spec/744776122?ad, Height=5.4mm, Length=10mm, Manufacturer Part Number=744776122, Match Code=WE-PD2, Mount="Surface Mount", Packaging="Tape and Reel", Width=9mm
L2: library part DROSEL, "Drosel", Manufacturer="Wuerth Elektronik", ComponentLink1Description="Manufacturer URL", ComponentLink1URL=http://www.we-online.com, ComponentLink2Description=Datasheet, ComponentLink2URL=http://katalog.we-online.de/pbs/datasheet/750311457.pdf, PackageReference=EP13, PartNumber=750311457, Ui=36V
P1 P4: "WR-WTB THT Male Vertical Locking Header, pitch 2.54mm, 2pins", Contact Resistance=20mΩ, Manufacturer="Wurth Elektronik", Operating Temperature Max=105°C, Operating Temperature Min=-40°C, Rated Current=3A, Withstanding Voltage=1000VAC, Working Voltage=250VAC, Category="Wire-to-Board Connectors", ComponentLink1Description="Website Link", ComponentLink1URL=https://www.we-online.com/redexpert/article/61900211121?ad, ComponentLink2Description="Datasheet Link", ComponentLink2URL=https://www.we-online.com/redexpert/spec/61900211121?ad, Gender=Male, Height=11.5mm, Length=5.08mm, Manufacturer Part Number=61900211121, Match Code=WR-WTB, Mount="Through Hole", Number of Pins=2, Number of Rows=1, Orientation=Vertical, Packaging=Bag, Pitch=2.54mm, Width=5.8mm
P2 P3: "WR-WTB THT Male Vertical Locking Header, pitch 2.54mm, 4pins", Contact Resistance=20mΩ, Manufacturer="Wurth Elektronik", Operating Temperature Max=105°C, Operating Temperature Min=-40°C, Rated Current=3A, Withstanding Voltage=1000VAC, Working Voltage=250VAC, Category="Wire-to-Board Connectors", ComponentLink1Description="Website Link", ComponentLink1URL=https://www.we-online.com/redexpert/article/61900411121?ad, ComponentLink2Description="Datasheet Link", ComponentLink2URL=https://www.we-online.com/redexpert/spec/61900411121?ad, Gender=Male, Height=11.5mm, Length=10.16mm, Manufacturer Part Number=61900411121, Match Code=WR-WTB, Mount="Through Hole", Number of Pins=4, Number of Rows=1, Orientation=Vertical, Packaging=Bag, Pitch=2.54mm, Width=5.8mm
P5: "WR-WTB THT Male Vertical Locking Header, pitch 2.54mm, 3pins", Contact Resistance=20mΩ, Manufacturer="Wurth Elektronik", Operating Temperature Max=105°C, Operating Temperature Min=-40°C, Rated Current=3A, Withstanding Voltage=1000VAC, Working Voltage=250VAC, Category="Wire-to-Board Connectors", ComponentLink1Description="Website Link", ComponentLink1URL=https://www.we-online.com/redexpert/article/61900311121?ad, ComponentLink2Description="Datasheet Link", ComponentLink2URL=https://www.we-online.com/redexpert/spec/61900311121?ad, Gender=Male, Height=11.5mm, Length=7.62mm, Manufacturer Part Number=61900311121, Match Code=WR-WTB, Mount="Through Hole", Number of Pins=3, Number of Rows=1, Orientation=Vertical, Packaging=Bag, Pitch=2.54mm, Width=5.8mm
Q1 Q2 Q3 Q4: library part "IGBT 60N120T", "IGBT 60N120T TO-264-3"
Q5: library part CMP-65434-000005-1, "OPTOISOLATOR 5KV TRANS 4SMD", Case/Package=SMD/SMT, Collector Emitter Saturation Voltage=200mV, Collector Emitter Voltage (VCEO)=80V, Forward Current=50mA, Forward Voltage=1.4V, Isolation Voltage=5kV, Max Operating Temperature=100°C, Max Power Dissipation=200mW, Min Operating Temperature=-30°C, Output Current per Channel=30mA, Package Quantity=2000, Reverse Breakdown Voltage=6V, Collector-emitter Voltage-Max=200mV, Contact Plating=Copper, Fall Time=18000ns, Input Current=50mA, Input Type=DC, Isolation Voltage-Max=5kV, Lead Free="Lead Free", Max Collector Current=50mA, Max Input Current=50mA, Max Output Voltage=80V, Mount="Surface Mount", Number of Channels=1, Number of Elements=1, Number of Pins=4, Output Voltage=80V, Packaging="Tape and Reel", Power Dissipation=200mW, Radiation Hardening=No, Rise Time=18000ns, RoHS Compliant=Yes
R1 R2 R3 R4 R6 R7 R8 R9 R10 R11 R12 R15 R16 R17 R23 R24 R32 R33 R34 R35 R36 R37 R38 R39 R40 R42 R43 R44 R45 R46 R47 R48: library part RES-CONST
R5 R41: library part CMP-2001-04908-2, "RES Thick Film, 10KΩ, 1%, 0.125W, 100ppm/°C, 0805", Case Code (Imperial)=0805, Case Code (Metric)=2012, Max Operating Temperature=155°C, Min Operating Temperature=-55°C, Package Quantity=5000, Power Rating=125mW, Resistance=10kR, Temperature Coefficient=100ppm/°C, Tolerance=1%, Voltage Rating=150V, Case/Package=0805, Composition="Thick Film", Contact Plating=Tin, Depth=1.25mm, Height=0.45mm, Lead Free="Lead Free", Length=2mm, Military Standard=Not, Packaging="Tape and Reel", Radiation Hardening=No, Termination=SMD/SMT, Voltage Rating (DC)=150V, Weight=0.000194oz, Width=1.25mm
R13 R25 RP1 RP2: library part RES_Adj
R14: library part CMP-2005-01987-2, "RES SMD 1K OHM 1% 1/2W 1992", Case Code (Imperial)=1210, Case Code (Metric)=3225, Max Operating Temperature=155°C, Max Power Dissipation=500mW, Min Operating Temperature=-55°C, Package Quantity=1, Resistance=0mR, Temperature Coefficient=0ppm/°C, Voltage Rating=200V, Case/Package=1210, Composition="Thick Film", Contact Plating=Tin, Depth=2.5mm, Features="Automotive AEC-Q200", Height=0.55mm, Length=3.2mm, Military Standard=Not, Mount="Surface Mount", Number of Terminations=2, Packaging="Tape and Reel", Power Rating=500mW, Radiation Hardening=No, REACH SVHC="No SVHC", Termination=SMD/SMT, Weight=0.000564oz, Width=0.098inch
R18: library part RES_1210
R19: library part RES-CONST, "470"
R20: library part CMP-2005-01987-2, "RES SMD 10K OHM 1% 1/2W 1992", Case Code (Imperial)=1210, Case Code (Metric)=3225, Max Operating Temperature=155°C, Max Power Dissipation=500mW, Min Operating Temperature=-55°C, Package Quantity=1, Resistance=0mR, Temperature Coefficient=0ppm/°C, Voltage Rating=200V, Case/Package=1210, Composition="Thick Film", Contact Plating=Tin, Depth=2.5mm, Features="Automotive AEC-Q200", Height=0.55mm, Length=3.2mm, Military Standard=Not, Mount="Surface Mount", Number of Terminations=2, Packaging="Tape and Reel", Power Rating=500mW, Radiation Hardening=No, REACH SVHC="No SVHC", Termination=SMD/SMT, Weight=0.000564oz, Width=0.098inch
R21: library part CMP-2005-01987-2, "RES SMD 205K OHM 1% 1/2W 1992", Case Code (Imperial)=1210, Case Code (Metric)=3225, Max Operating Temperature=155°C, Max Power Dissipation=500mW, Min Operating Temperature=-55°C, Package Quantity=1, Resistance=0mR, Temperature Coefficient=0ppm/°C, Voltage Rating=200V, Case/Package=1210, Composition="Thick Film", Contact Plating=Tin, Depth=2.5mm, Features="Automotive AEC-Q200", Height=0.55mm, Length=3.2mm, Military Standard=Not, Mount="Surface Mount", Number of Terminations=2, Packaging="Tape and Reel", Power Rating=500mW, Radiation Hardening=No, REACH SVHC="No SVHC", Termination=SMD/SMT, Weight=0.000564oz, Width=0.098inch
RG1 RG2: "REG IC REG LINEAR 12V 1A TO220AB", Current-Output=1A, Digikey Part Number=LM7805CT-ND, Manufacturer=Fairchild, Mouser Part Number=512-LM7805CT, Package=TO220, Temperature="-40°C to +125°C", Temperature Range High=+125°C, Temperature Range Low=-40°C, Voltage - Input (Max)=35V, Voltage - Output=5V, Voltage Dropout (Max)="2V @ 1A (Typ)", ComponentLink1Description=Upverter, ComponentLink1URL=https://upverter.com/upn/revision/b27a7358b7dd93a3/, ComponentLink2Description=Datasheet, ComponentLink2URL=https://www.fairchildsemi.com/datasheets/LM/LM7805.pdf, Digikey Description="REG IC REG LINEAR 5V 1A TO220AB", helpURL=https://upverter.com/upn/revision/b27a7358b7dd93a3/, Ipc Land Pattern Name=TO-220, Lead Free=yes, Part Number=LM7812CT, Price=0.384521982769, RoHS=TRUE, Supplier 1=Digi-Key, Supplier 2=Mouser, Supplier Part Number 1=LM7805CT-ND, Supplier Part Number 2=512-LM7805CT
RG3: "REG IC REG LINEAR 5V 1A TO220AB", Current-Output=1A, Digikey Part Number=LM7805CT-ND, Manufacturer=Fairchild, Mouser Part Number=512-LM7805CT, Package=TO220, Temperature="-40°C to +125°C", Temperature Range High=+125°C, Temperature Range Low=-40°C, Voltage - Input (Max)=35V, Voltage - Output=5V, Voltage Dropout (Max)="2V @ 1A (Typ)", ComponentLink1Description=Upverter, ComponentLink1URL=https://upverter.com/upn/revision/b27a7358b7dd93a3/, ComponentLink2Description=Datasheet, ComponentLink2URL=https://www.fairchildsemi.com/datasheets/LM/LM7805.pdf, Digikey Description="REG IC REG LINEAR 5V 1A TO220AB", helpURL=https://upverter.com/upn/revision/b27a7358b7dd93a3/, Ipc Land Pattern Name=TO-220, Lead Free=yes, Part Number=LM7805CT, Price=0.384521982769, RoHS=TRUE, Supplier 1=Digi-Key, Supplier 2=Mouser, Supplier Part Number 1=LM7805CT-ND, Supplier Part Number 2=512-LM7805CT
TP1 TP2 TP3 TP4 TP5 TP6 TP7 TP8 TP9 TP10 TP11 TP12 TP13 TP14 TP15 TP16 TP17 TP18 TP19 TP20 TP21 TP22 TP23 TP24 TP25 TP26 TP27 TP28 TP29 TP30 TP31 TP32 TP33 TP34 TP35 TP36 TP37 TP38 TP39 TP40 TP41: library part TP_PCB?, "Test_Point"
TR1: library part EE_85_IV
U2: library part CMP-1310-00291-2, "IC OPAMP GP 2 CIRCUIT 8SOIC", Case/Package=SOIC, Dual Supply Voltage=9V, Input Bias Current=250nA, Input Offset Voltage (Vos)=7mV, Max Dual Supply Voltage=16V, Max Operating Temperature=70°C, Max Supply Voltage=32V, Min Dual Supply Voltage=1.5V, Min Operating Temperature=0°C, Min Supply Voltage=3V, Nominal Supply Current=1.2mA, Operating Supply Current=1.5mA, Output Current=40mA, Package Quantity=2500, Power Supply Rejection Ratio (PSRR)=65dB, Voltage Gain=100dB, Bandwidth=1MHz, Common Mode Rejection Ratio=65dB, Contact Plating=Tin, Gain Bandwidth Product=1MHz, Halogen Free="Halogen Free", Height=1.5mm, Lead Free="Lead Free", Length=5mm, Number of Amplifiers=2, Number of Channels=2, Number of Circuits=2, Number of Elements=2, Number of Pins=8, Operating Supply Voltage=16V, Output Current per Channel=40mA, Packaging="Tape and Reel", Radiation Hardening=No, REACH SVHC="No SVHC", Slew Rate=0.6V/µs, Width=4mm
U3 U6: library part LM2576D2T-005G
U4: library part TL431_SOT-23-3, "TL431_SOT-23-3"
U5: library part CMP-0003-00378-2, "16-Bit ADC with Integrated Multiplexer, PGA, Comparator, Oscillator, and Reference, -40 to 125 degC, 10-pin SOP (DGS10), Green (RoHS & no Sb/Br)", Analog Voltage AV/DD(Max)(V)=5.5, Analog Voltage AV/DD(Min)(V)=2, Manufacturer="Texas Instruments", # Input Channels=4, Architecture=Delta-Sigma, Code_JEDEC=MO-153, ComponentLink1Description="Manufacturer URL", ComponentLink1URL=http://www.ti.com/, ComponentLink2Description=Datasheet, ComponentLink2URL=http://www.ti.com/general/docs/lit/getliterature.tsp?genericPartNumber=ADS1115&fileType=pdf, ComponentLink3Description="Package Specification", ComponentLink3URL=http://www.ti.com/lit/ml/mpds035b/mpds035b.pdf, DatasheetVersion=SBAS444B, Digital Supply(Max)(V)=5.5, Digital Supply(Min)(V)=2, Eco-Plan="Green (RoHS & no Sb/Br)", INL(Max)(+/-LSB)=1, Interface="Serial I2C", Mounting Technology="Surface Mount", PackageDescription="10-Pin Plastic Small Outline, Body 3 x 3 mm, Pitch 0.5 mm", PackageReference=DGS10, PackageVersion="4073272/C, 02/2004", PartNumber=ADS1115IDGST, Resolution(Bits)=16, Sample Rate (max)(SPS)=860, SubFamily="Precision ADC (<=10MSPS)"

## Via types
v1: diameter 0.8, hole 0.5, Top Layer to Bottom Layer, 266 vias
v2: diameter 0.8, hole 0.4, Top Layer to Bottom Layer, 28 vias
v3: diameter 1.27, hole 0.711, Top Layer to Bottom Layer, 4 vias

## Nets (pads, with @x,y where several pads share a name; then routed paths per layer and width w, separated by ;. In a path a pad name is that pad's centre, name@x,y a point inside that pad or via, vN(x,y) a via of type N, cw(c..) or ccw(c..) an arc to the next point about the centre after c; other vN are vias at no path point)
+5V: C8.2 C18.2 C23.1 DD1.4 DD2.8 J10.1 P3.1 R32.2 R33.2 R34.2 R36.2 R41.2 RG3.3 TP37.1 U1.1 U5.8 | length 265.5
  Top Layer w0.5: v2(8.749,18.125) 8.749,20.199 10.526,21.976 DD1.4@19.306,21.976
  Top Layer w0.8: P3.1@16.151,4.781 16.481,4.451 17.957,2.975 24.35,2.975 25.5,4.125 v2(25.5,24.6) ; v2(21.25,39.2) 21.2,39.25 21.2,49.55 23.275,51.625 23.275,73.3 v2(23.15,73.425) ; v3(39.691,34.966) 74.4,34.966
  Top Layer w1.5: J10.1@74.4,7.5 74.4,34.966 74.4,36.1 82.25,43.95 C23.1@82.25,48.25
  Bottom Layer w0.3: R36.2@8.759,18.859 R36.2@8.775,18.875 ; C18.2@10.769,18.66 C18.2@10.797,18.632 11.039,18.39 13.464,18.39 13.845,18.771 U5.8@13.845,19.932 13.845,21.057 13.088,21.814 DD2.8@13.088,22.883
  Bottom Layer w0.5: v2@8.749,18.075 v2(8.749,18.125) R36.2@8.749,18.644 ; R36.2@8.775,18.66 C18.2@10.769,18.66
  Bottom Layer w0.8: R33.2@17.274,15.072 17.163,15.183 R34.2@17.163,16.612 17.163,19.833 DD1.4@19.306,21.976 22.876,21.976 v2(25.5,24.6) 25.5,34.931 ; v2(21.25,39.2) 21.25,39.181 25.5,34.931 ; v3(39.691,34.966) 39.656,34.931 25.5,34.931
  Bottom Layer w1: v2(23.15,73.425) 19.75,76.825 19.75,86.125 28.469,94.844 TP37.1@31.625,94.844 U1.1@34.165,94.844 34.165,90.528 34.316,90.377 C8.2@34.316,90.352 ; RG3.3@71.157,46.827 71.184,46.8 R41.2@73.95,46.8
  Bottom Layer w1.5: RG3.3@71.157,46.827 80.827,46.827 C23.1@82.25,48.25
+5V_ISOL: C19.1 DD1.2 DD2.1 P2.1 R35.2 R37.2 | length 21.9
  Top Layer w0.5: v2(13.083,30.455) 14.607,28.931 17.401,28.931 DD1.2@19.306,27.026
  Bottom Layer w0.5: P2.1@5.509,29.439 12.982,29.439 DD2.1@13.093,29.328 ; DD2.1@13.088,28.883 13.093,28.888 DD2.1@13.093,29.328 ; C19.1@13.099,35.535 13.093,35.529 DD2.1@13.093,29.328
GND: *PWM1.8 *PWM1.14 *PWM1.18 C7.2 C8.1 C12.2 C13.2 C17.1 C18.1 C20.1 C21.2 C22.1 C23.2 C24.2 C25.2 C26.1 C28.2 C29.1 CR2.2 D8.1 D10.1 D12.2 D14.2 D16.2 D17.2 DD1.3 DD2.5 J7.3 J10.2 P1.2 P3.4 P5.3 Q2.3 Q4.3 R12.1 R14.1 R15.1 R16.1 R17.1 R20.1 R22.1 R25.3 R31.1 R40.1 R43.1 R46.2 R48.1 RG2.2 RG3.2 U1.2 U5.3 U6.3 U6.5 U6.6 | length 541.1
  Top Layer w1: DD1.3@19.306,24.516 23.751,24.516 ; P3.4@23.751,4.801 23.751,47.626 34.012,57.887 *PWM1.8@36.07,57.887 53.387,57.887 54.453,58.953 R17.1@57.152,58.953 57.152,52.53 52.929,48.308 52.929,42.735 ; *PWM1.14@36.07,73.127 38.677,73.127 v2(41.625,76.075) ; *PWM1.18@36.07,83.668 U1.2@36.07,94.844 ; R25.3@50.025,42.735 52.929,42.735 ; D12.2@55.867,42.701 55.833,42.735 52.929,42.735 ; RG3.2@68.617,46.827 68.617,42.783 71.925,39.475 D16.2@74.025,39.475 ; C23.2@89.688,48.188 C23.2@89.75,48.25 ; C20.1@109.25,13.425 126.975,13.425 v2(128.65,11.75)
  Top Layer w1.5: R15.1@79.631,58.953 87.875,50.709 87.875,50 C23.2@89.688,48.188 ; RG2.2@86.525,35.075 86.525,45.025 C23.2@89.688,48.188 ; C21.2@96.675,19.829 C21.2@96.675,19.875 CR2.2@109.126,19.875 ; D14.2@101.42,33.076 105.032,36.688 105.032,41.148 D17.2@101.42,44.76 93.115,44.76 C23.2@89.688,48.188 ; C20.1@109.25,13.425 CR2.2@109.25,19.8
  Bottom Layer w0.3: C18.1@10.797,17.132 11.039,17.374 13.464,17.374 13.845,16.993 U5.3@13.845,15.832 13.845,13.167 R40.1@13.734,13.056 ; C24.2@26.513,7.643 C24.2@26.636,7.52
  Bottom Layer w0.5: 8.796,11.929 8.796,12.146 10.797,14.147 C18.1@10.797,17.132 ; DD2.5@16.898,22.883 16.898,23.306 16.975,23.383 16.977,23.383 17.36,23.766 18.11,24.516 DD1.3@19.306,24.516
  Bottom Layer w0.8: P5.3@6.225,58.141 8.609,58.141 8.863,57.887 38.383,57.887 ; C24.2@26.513,7.643 26.513,9.573 25.344,9.573 24.875,10.041 24.875,14.407 25.423,14.955 26.578,14.955 C28.2@26.624,15.001 28.427,15.001 28.431,14.997 C26.1@28.652,14.997 ; C26.1@28.656,15.124 R46.2@32.847,15.124 ; *PWM1.14@36.07,73.127 38.148,73.127 39.575,71.7 39.575,59.079 38.383,57.887 ; R20.1@40.515,55.755 40.515,55.816 40.274,56.057 40.213,56.057 38.383,57.887 ; D8.1@98.148,128.88 D8.1@98.148,128.855 ; C12.2@99.875,122.292 98.164,122.292 D10.1@98.148,122.276 98.098,122.326 98.098,122.351 96.776,123.673 96.776,127.508 98.073,128.805 98.098,128.805 D8.1@98.148,128.855 ; 116.4,132.2 115.175,132.2 113.85,133.525 103.15,133.525 100.1,130.475 100.1,128.737 98.416,128.737 98.348,128.805 98.198,128.805 D8.1@98.148,128.855
  Bottom Layer w1: P1.2@4.909,11.659 6.692,11.659 C17.1@6.862,11.829 ; C17.1@6.987,11.929 8.796,11.929 13.175,7.55 13.175,4.55 14.825,2.9 21.85,2.9 P3.4@23.751,4.801 26.295,7.345 26.611,7.345 26.636,7.37 C24.2@26.636,7.52 ; R14.1@30.101,73.1 30.114,73.114 36.057,73.114 *PWM1.14@36.07,73.127 ; U1.2@36.07,94.844 36.07,90.623 36.316,90.377 C8.1@36.316,90.352 36.339,90.376 37.587,90.376 R12.1@37.61,90.399 C7.2@37.61,88.621 37.61,88.596 36.07,87.056 *PWM1.18@36.07,83.287 39.138,83.287 41.625,80.8 v2(41.625,76.075) ; R22.1@60.126,160.022 60.329,159.82 60.329,159.096 63.836,155.589 Q2.3@63.836,152.387 ; C20.1@109.25,13.425 111.35,11.325 C29.1@111.35,8.125 ; U6.5@116.423,7.908 116.423,14.809 U6.6@119.827,18.213 ; U6.3@119.827,7.908 119.835,7.916 119.835,10.835 119.827,10.843 U6.6@119.827,18.213 ; U6.6@120.967,18.213 U6.6@119.827,18.213 ; R31.1@125.912,160.022 125.912,159.321 126.115,159.119 126.206,159.119 129.036,156.289 Q4.3@129.036,152.387 ; R43.1@128.65,10.7 v2(128.65,11.75)
  Bottom Layer w1.5: C22.1@60.8,37.75 60.8,41.675 62.35,43.225 62.35,53.375 ; J10.2@79.4,7.5 82.725,4.175 91.075,4.175 J7.3@94.345,7.445 ; J7.3@94.4,7.5 96.675,9.775 C21.2@96.675,19.875 96.675,28.331 D14.2@101.42,33.076 ; CR2.2@109.275,19.825 118.215,19.825 U6.6@119.827,18.213
  Bottom Layer w2: RG3.2@68.617,46.827 RG3.2@68.617,53.177